# Altium PCB PCB_L2-P2.3.PcbDoc
Units mm, origin at the board's own origin, x right, y up, seen from the top; angles counter-clockwise.
Board outline 155.28 x 23.28 mm, 2 copper layers (Top Layer, Bottom Layer); 45 components, 45 nets, 147 pads, 77 vias.
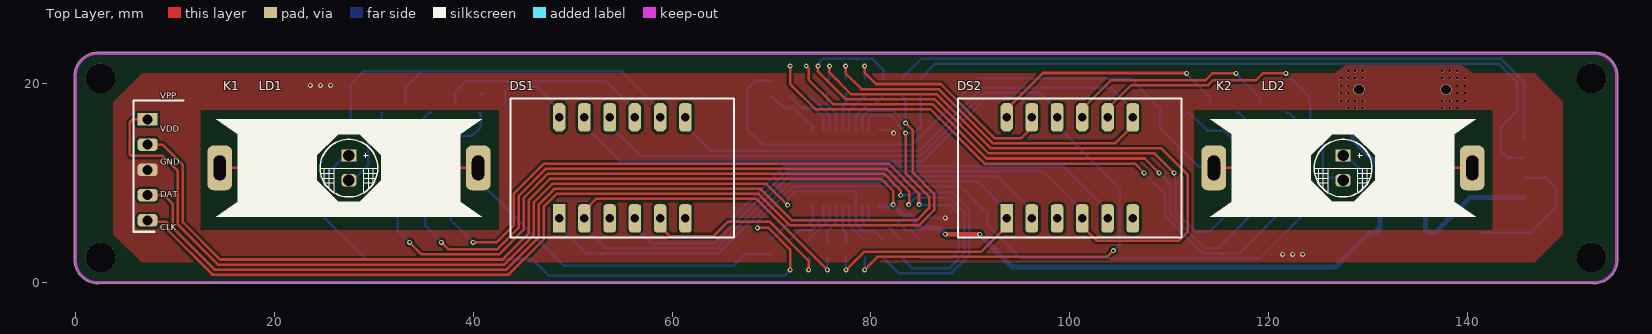
[diagram p0: Top Layer view]
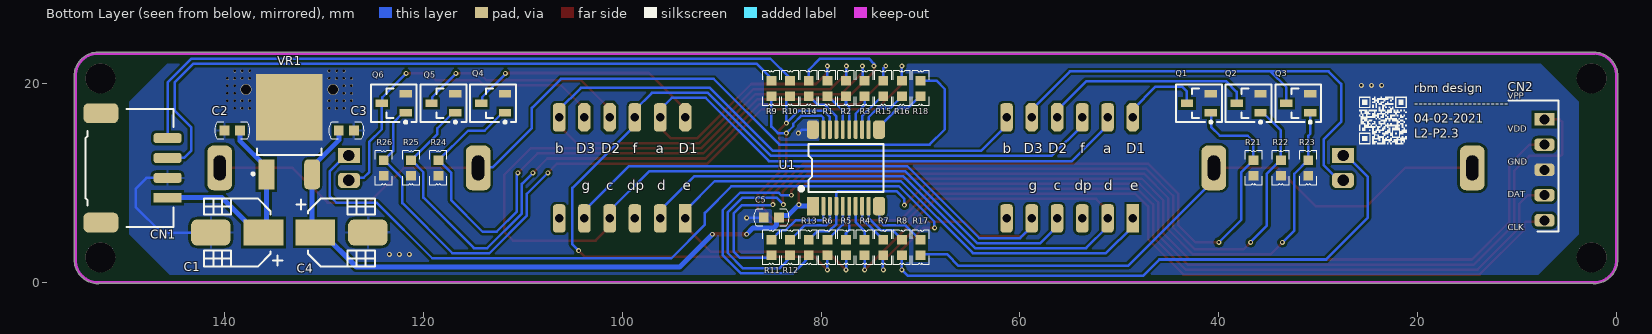
[diagram p1: Bottom Layer view, seen from below]
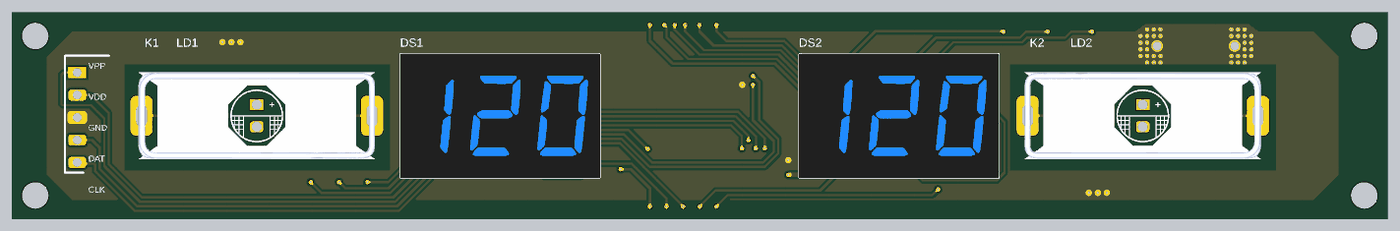
[diagram p2: 3D render of the assembled board from above, using the file's embedded part models]
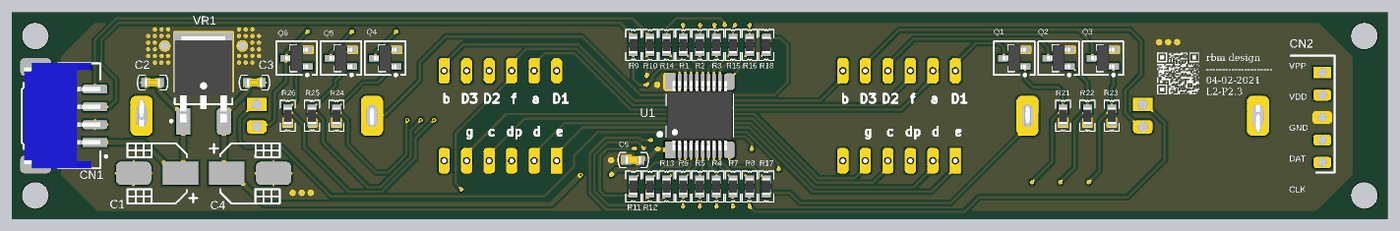
[diagram p3: 3D render of the assembled board from below, using the file's embedded part models]

## Layer stack, top to bottom
Top Solder: solder mask 0.0102, Solder Resist, Dk 3.5
Top Layer: signal copper 0.0356
Dielectric 1: dielectric 0.32, FR-4, Dk 4.8
Bottom Layer: signal copper 0.0356
Bottom Solder: solder mask 0.0102, Solder Resist, Dk 3.5

## Board outline
-0.139,2.25 cw(c-0.011,2.25) -0.127,2.302 -0.127,20.698 cw(c-0.011,20.75) -0.139,20.75 cw(c2.25,20.75) 2.25,23.139 cw(c2.25,23.011) 2.302,23.127 152.698,23.127 cw(c152.75,23.011) 152.75,23.139 cw(c152.75,20.75) 155.139,20.75 cw(c155.011,20.75) 155.127,20.698 155.127,2.302 cw(c155.011,2.25) 155.139,2.25 cw(c152.75,2.25) 152.75,-0.139 cw(c152.75,-0.011) 152.698,-0.127 2.302,-0.127 cw(c2.25,-0.011) 2.25,-0.139 cw(c2.25,2.25)

## Design rules (kind name [scope] priority, off if disabled: settings)
Clearance [All] p1: gap=0.254 ignorepadtopadclearanceinfootprint=FALSE except(0: Arc-Hole Track-Hole SMDPad-Hole THPad-Hole Via-Hole Fill-Hole Poly-Hole Region-Hole Text-Hole)
HoleSize [All] p1: absolutevalues=TRUE maxlimit=4 minlimit=0.025 maxpercent=80.000 minpercent=20.000
PlaneConnect [All] p1: planeconnectstyle=Direct reliefexpansion=0.508 reliefentries=4 reliefconductorwidth=0.254 reliefairgap=0.254
PolygonConnect [All] p1: connectstyle=Direct reliefconductorwidth=0.254 reliefentries=4 polygonreliefangle="90 Angle" airgapwidth=0.254
RoutingVias [All] p1: holewidth=0.25 width=0.5 viastyle="Through Hole" minholewidth=0.2 minwidth=0.25 maxholewidth=1 maxwidth=2
SolderMaskExpansion [All] p1: expansion=0.102 istentingtop=FALSE
Width [All] p1: maxlimit=0.5 minlimit=0.254 preferedwidth=0.254
28 further rules are at their usual default settings.

## Components (designator, comment, footprint, x,y, rotation, side; value= is the part's Value field where it differs from the comment)
C1 "100uF ±20% 25V" C_SMD_Ø6.3*5.4mm 138.75,5 r0 bottom
C2 "470nF ±10% 25V X7R" C_0603 139.25,15.25 r0 bottom
C3 "100nF ±10% 25V X7R" C_0603 127.75,15.25 r180 bottom
C4 "100uF ±20% 16V" C_SMD_Ø6.3*5.4mm 128.25,5 r180 bottom
C5 "470nF ±10% 25V X7R" C_0603 85,6.5 r0 bottom
CN1 "PH Header Male; White" CN_4P_A2001WR-S-XP-LCP 148.5,11.5 r0 bottom
CN2 "Pin Header" CN_PIC_MCU_Debugger_RightAngle 7.239,11.303 r180 bottom
DS1 "Display>> 7Seg 3Dig" "DS_0.36\"_3DIG" 55,11.5 r0 top locked
DS2 "Display>> 7Seg 3Dig" "DS_0.36\"_3DIG" 100,11.5 r0 top locked
K1 "Holo Type" K_CAP-TOUCH-SQUARE_LED 27.5,11.5 r180 top locked
K2 "Holo Type" K_CAP-TOUCH-SQUARE_LED 127.5,11.5 r0 top locked
LD1 "3.2V 20mA >1000mcd" LED_4.8x5.8_P2.54 27.5,11.5 r270 top locked
LD2 "3.2V 40mA >1000mcd" LED_4.8x5.8_P2.54 127.5,11.5 r270 top locked
Q1 "NPN 500mA 45V 300mW" Q_SOT-23_NPN 42,18 r90 bottom locked
Q2 "NPN 500mA 45V 300mW" Q_SOT-23_NPN 37,18 r90 bottom
Q3 "NPN 500mA 45V 300mW" Q_SOT-23_NPN 32,18 r90 bottom
Q4 "NPN 500mA 45V 300mW" Q_SOT-23_NPN 113,18 r90 bottom
Q5 "NPN 500mA 45V 300mW" Q_SOT-23_NPN 118,18 r90 bottom
Q6 "NPN 500mA 45V 300mW" Q_SOT-23_NPN 123,18 r90 bottom
R1 "120Ω ±1% 0.125W ±100ppm/℃" R_0603 79.375,19.5 r90 bottom
R2 "120Ω ±1% 0.125W ±100ppm/℃" R_0603 77.5,19.5 r90 bottom
R3 "120Ω ±1% 0.125W ±100ppm/℃" R_0603 75.625,19.5 r90 bottom
R4 "120Ω ±1% 0.125W ±100ppm/℃" R_0603 75.625,3.5 r270 bottom
R5 "120Ω ±1% 0.125W ±100ppm/℃" R_0603 77.5,3.5 r270 bottom
R6 "120Ω ±1% 0.125W ±100ppm/℃" R_0603 79.375,3.5 r270 bottom
R7 "120Ω ±1% 0.125W ±100ppm/℃" R_0603 73.75,3.5 r270 bottom
R8 "120Ω ±1% 0.125W ±100ppm/℃" R_0603 71.875,3.5 r270 bottom
R9 "120Ω ±1% 0.125W ±100ppm/℃" R_0603 85,19.5 r90 bottom
R10 "120Ω ±1% 0.125W ±100ppm/℃" R_0603 83.125,19.5 r90 bottom
R11 "1kΩ ±1% 0.1W ±50ppm/℃" R_0603 85,3.5 r270 bottom
R12 "1kΩ ±1% 0.1W ±50ppm/℃" R_0603 83.125,3.5 r270 bottom
R13 "1kΩ ±1% 0.1W ±50ppm/℃" R_0603 81.25,3.5 r270 bottom
R14 "1kΩ ±1% 0.1W ±50ppm/℃" R_0603 81.25,19.5 r90 bottom
R15 "1kΩ ±1% 0.1W ±50ppm/℃" R_0603 73.75,19.5 r90 bottom
R16 "1kΩ ±1% 0.1W ±50ppm/℃" R_0603 71.875,19.5 r90 bottom
R17 "1kΩ ±1% 0.1W ±50ppm/℃" R_0603 70,3.5 r270 bottom
R18 "1kΩ ±1% 0.1W ±50ppm/℃" R_0603 70,19.5 r90 bottom
R21 "47kΩ ±1% 0.1W ±100ppm/℃" R_0603 36.5,11.5 r270 bottom
R22 "47kΩ ±1% 0.1W ±100ppm/℃" R_0603 33.75,11.5 r270 bottom
R23 "47kΩ ±1% 0.1W ±100ppm/℃" R_0603 31,11.5 r270 bottom
R24 "47kΩ ±1% 0.1W ±100ppm/℃" R_0603 118.5,11.5 r270 bottom
R25 "47kΩ ±1% 0.1W ±100ppm/℃" R_0603 121.25,11.5 r270 bottom
R26 "47kΩ ±1% 0.1W ±100ppm/℃" R_0603 124,11.5 r270 bottom
U1 "PIC16F18346T-I/SS" U_PIC_20pin_SSOP 77.5,11.5 r90 bottom locked
VR1 "Fixed 5V @ 1A(typ)" VR_TO-252-2(DPAK) 133.5,15 r180 bottom

## Footprints (in the part's own frame and the unit in brackets; to place one, negate y for a bottom-side part, rotate by r counter-clockwise, add the part's x,y. Pads: shape width x height; smd on the part's side, far side on the other; paste and mask are expansions set on the pad)
C_0603 [mm] "0603 Multilayer Ceramic Capacitors MLCC - SMD/SMT RoHS"
  rect 1x1 smd: 1(-0.775,0) 2(0.775,0)
  silkscreen extent -1.72,-0.85 1.72,0.85, body extent -0.85,-0.45 0.85,0.45, height 0.87
C_SMD_Ø6.3*5.4mm [mm] "SMD 6.3x5.4mm Aluminum Electrolytic Capacitors - SMD RoHS"
  rect 4x2.65 smd: 1(-2.65,0)
  rrect50% 4x2.65 smd: 2(2.65,0)
  silkscreen extent -4.54,-3.4 3.35,3.4, body extent -3.4,-3.4 3.4,3.4, height 5.8
CN_4P_A2001WR-S-XP-LCP [mm]
  rrect50% 3.5x2 smd: 0(3.95,-5.5) 0(3.95,5.5)
  rect 2.8x1 smd: 1(-2.75,3)
  rrect50% 2.8x1 smd: 2(-2.75,1) 3(-2.75,-1) 4(-2.75,-3)
  round 0.5 on Bottom Overlay: ""(-4,4.6)
  silkscreen extent -3.35,-5.94 5.51,5.95, body extent -3.35,-5.95 5.25,5.95, height 5.6
CN_PIC_MCU_Debugger_RightAngle [mm] "2.54mmPitch, 5pins, StraightType, Male Connector"
  rect 2x1.25 hole 1: 1(0,5.08)
  rrect50% 2x1.25 hole 1: 2(0,2.54) 3(0,0) 4(0,-2.54) 5(0,-5.08)
  silkscreen extent -3.6,-6.22 1.4,6.98
"DS_0.36\"_3DIG" [mm] "SLR0363DWC1BD"
  rect 1.25x2.85 hole 0.85: 1(-6.35,-5.08)
  rrect50% 1.25x2.85 hole 0.85: 2(-3.81,-5.08) 3(-1.27,-5.08) 4(1.27,-5.08) 5(3.81,-5.08) 6(6.35,-5.08) 7(6.35,5.08) 10(-1.27,5.08) 11(-3.81,5.08)
  oct 1.25x2.85 hole 0.85: 8(3.81,5.08) 9(1.27,5.08) 12(-6.35,5.08)
  silkscreen extent -11.25,-7 11.25,7, body extent -11.3,-7.05 11.3,7.05, height 7.2
K_CAP-TOUCH-SQUARE_LED [mm]
  rrect50% 2.5x4.5 hole 2.5 slot 1.25 at 0 deg: 1(-13,0) 1(13,0)
  silkscreen extent -13.35,-4.9 13.35,4.9, body extent -13.35,-4.85 13.35,4.86, height 11.61
LED_4.8x5.8_P2.54 [mm] "HL-798H256WC-MD"
  rect 1.25x1.5 / inner rect 1.5x2.2 / far side rect 1.5x2.2 hole 1.15: 1(-1.25,0)
  rrect50% 1.25x1.5 / inner rrect50% 1.5x2.2 / far side rrect50% 1.5x2.2 hole 1.15: 2(1.25,0)
  silkscreen extent -2.88,-2.9 2.92,2.9, body extent -2.88,-2.9 2.92,2.9, height 4.8
Q_SOT-23_NPN [mm] "NPN 200mA 40V 250mW SOT-23(SOT-23-3)"
  rect 0.75x1.25 smd: 1(-0.95,-1.2) 2(0.95,-1.2) 3(0,1.2)
  silkscreen extent -2.02,-2.3 1.9,2.3, body extent -1.5,-1.3 1.5,1.3, height 1.15
R_0603 [mm] "RK73G1JTTD1000F; 0603 Chip Resistor - Surface Mount RoHS"
  rect 0.95x1 smd: 1(-0.775,0) 2(0.775,0)
  silkscreen extent -1.75,-0.85 1.75,0.85, body extent -0.9,-0.45 0.9,0.45, height 0.55
U_PIC_20pin_SSOP [mm] "SOP, 20-Leads, Body 7.20x5.30mm, Pitch 0.65mm, IPC Medium Density"
  rect 1.85x1.2 smd mask+0.2: 1(-3.85,3.33)
  rrect50% 1.85x0.395 smd mask+0.2: 2(-3.85,2.275) 3(-3.85,1.625) 4(-3.85,0.975) 5(-3.85,0.325) 6(-3.85,-0.325) 7(-3.85,-0.975) 8(-3.85,-1.625) 9(-3.85,-2.275) 12(3.85,-2.275) 13(3.85,-1.625) 14(3.85,-0.975) 15(3.85,-0.325) 16(3.85,0.325) 17(3.85,0.975) 18(3.85,1.625) 19(3.85,2.275)
  rrect50% 1.85x1.2 smd mask+0.2: 10(-3.85,-3.33) 11(3.85,-3.33) 20(3.85,3.33)
  silkscreen extent -2.4,-3.75 2.4,4.63, body extent -3.9,-3.75 3.9,3.75, height 2
VR_TO-252-2(DPAK) [mm] "D-PAK, 3-Pads, Body 6.20x6.61mm (max), IPC Medium Density"
  rect 6.7x6.7 smd: GND(0,2.6)
  rect 1.6x3 smd: V-IN(-2.3,-4.15)
  rrect50% 1.6x3 smd: V-OUT(2.3,-4.15)
  silkscreen extent -3.78,-4.22 3.25,-1.55, body extent -3.25,-4.27 3.25,5.45, height 2.5

## Part data
C1 C4: library part "Capacitor>> Polar", "SMD,6.3x5.4mm Aluminum Electrolytic Capacitors - SMD RoHS"
C2 C3 C5: library part "Capacitor>> Non-Polar", "0603 Multilayer Ceramic Capacitors MLCC - SMD/SMT RoHS"
CN1: library part "Connector>> 4Pins", "A2001WR-S-4P; Pin 0.079\"(2.00mm) 4 SMD,P=2mm Wire To Board / Wire To Wire Connector RoHS"
CN2: library part "Connector>> PIC Program", "A2541WR-5P/MTB125-1105R1/PZ254R-11-05P ;5pins, right-angle 90degrees 2.54mm Through Hole,P=2.54mm Pin Header & Female Header RoHS"
K1 K2: library part "Key>> Cap Touch"
LD1 LD2: library part "LED>> General Purpose"
Q1 Q2 Q3 Q4 Q5 Q6: library part "Transistor>> BJT npn", "BC817-40; SOT-23(SOT-23-3) Transistors (NPN/PNP) RoHS"
R1 R2 R3 R4 R5 R6 R7 R8 R9 R10: library part "Resistor>> General Purpose", "RK73H1JTTD1200F; 0603 Chip Resistor - Surface Mount RoHS"
R11 R12 R13 R14 R15 R16 R17 R18: library part "Resistor>> General Purpose", "RK73G1JTTD1001F; 0603 Chip Resistor - Surface Mount RoHS"
R21 R22 R23 R24 R25 R26: library part "Resistor>> General Purpose", "RK73H1JTTD4702F; 0603 Chip Resistor - Surface Mount RoHS"
U1: library part "IC>> PIC 20Pins", "Lead Count: 20 / Package Type: SSOP / Temp Range: -40C to +85C / Packing Media: Tape and reel (1600)"
VR1: library part "Voltage Regulator", "CJ78D05/MC7805BDTRKG; TO-252-2(DPAK) Dropout Regulators(LDO) RoHS"

## Free pads (board coordinates)
  round 3 hole 3 unplated: 0(2.5,2.5) 0(2.5,20.5) 0(152.5,2.5) 0(152.5,20.5)

## Via types
v1: diameter 0.5, hole 0.25, Top Layer to Bottom Layer, 39 vias
v2: diameter 0.275, hole 0.25, Top Layer to Bottom Layer, 36 vias
v3: diameter 1.1, hole 1, Top Layer to Bottom Layer, 2 vias

## Nets (pads, with @x,y where several pads share a name; then routed paths per layer and width w, separated by ;. In a path a pad name is that pad's centre, name@x,y a point inside that pad or via, vN(x,y) a via of type N, cw(c..) or ccw(c..) an arc to the next point about the centre after c; other vN are vias at no path point)
+12: C1.1 C2.1 CN1.1 VR1.V-IN | length 22.6
  Bottom Layer w0.5: C2.1 138.475,14.225 135.8,11.55 VR1.V-IN 135.8,5.3 C1.1 136.775,5 140.275,8.5 CN1.1
CLK: CN2.5 R10.1 U1.18 | length 108.3
  Top Layer w0.254: CN2.5 7.366,6.096 9.122,6.096 9.271,5.947 9.271,5.251 13.76,0.762 43.557,0.762 47.117,4.322 47.117,7.624 48.383,8.89 68.703,8.89 71.878,5.715 84.836,5.715 86.36,7.239 86.36,8.89 84.23,11.02 84.23,15.269 v1(83.5,16)
  Bottom Layer w0.254: U1.18 79.125,16.613 79.784,17.272 82.228,17.272 v1@83.498,16.002 ; R10.1 83.15,18.725 83.498,18.377 v1@83.498,16.002 ; v1(83.5,16) v1@83.498,16.002
DAT: CN2.4 R9.1 U1.19 | length 109.8
  Top Layer w0.254: CN2.4 8.89,8.763 9.779,7.874 9.779,5.461 13.97,1.27 43.347,1.27 46.609,4.532 46.609,7.834 48.173,9.398 68.914,9.398 72.089,6.223 84.626,6.223 85.852,7.449 85.852,8.636 83.5,10.988 v1(83.5,15)
  Bottom Layer w0.254: U1.19 79.775,16.545 79.994,16.764 81.986,16.764 82.808,15.942 82.808,15.692 v1(83.5,15) 84.342,15 85,15.658 R9.1@85,18.975
GND: C1.2 C2.2 C3.2 C4.2 C5.2 CN1.2 CN2.3 Q1.2 Q2.2 Q3.2 Q4.2 Q5.2 Q6.2 R21.2 R22.2 R23.2 R24.2 R25.2 R26.2 U1.20 VR1.GND | length 17.7
  Bottom Layer w0.254: Q1.2 Q1.2@41.05,18.95 ; U1.20 81.914,15.35 82.264,15 v1(82.296,15) ; C5.2 85.798,6.477 v1(87.5,6.477) v1@87.503,6.477 ; C1.2 146.384,5 148.971,7.587 148.971,9.398 147.869,10.5 CN1.2
  other v1: 121.412,2.794 122.428,2.794 123.444,2.794 23.622,19.812 24.638,19.812 25.654,19.812
  other v2: 128,17.504 128.75,17.504 129.5,17.504 137.5,17.504 138.25,17.504 139,17.504 127.25,18.254 128,18.254 128.75,18.254 129.5,18.254 137.5,18.254 138.25,18.254 139,18.254 139.75,18.254 127.25,19.004 128,19.004 139,19.004 139.75,19.004 127.25,19.754 128,19.754 139,19.754 139.75,19.754 127.25,20.504 128,20.504 128.75,20.504 129.5,20.504 137.5,20.504 138.25,20.504 139,20.504 139.75,20.504 128,21.254 128.75,21.254 129.5,21.254 137.5,21.254 138.25,21.254 139,21.254
  other v3: 129.125,19.379 137.875,19.379
I_K1: R17.1 U1.10 | length 6.4
  Bottom Layer w0.254: R17.1 70.348,4.623 70.409,4.623 71.501,5.715 73.66,5.715 74.17,6.225 U1.10
I_K2: R18.1 U1.11 | length 5.7
  Bottom Layer w0.254: R18.1 70.348,18.377 70.396,18.377 71.247,17.526 72.263,17.526 74.17,15.619 U1.11
NetDS1_1: DS1.1 DS2.1 R5.2 | length 71.9
  Top Layer w0.254: v1(77.5,1.25) 79.298,3.048 91.078,3.048 93.65,5.62 DS2.1
  Bottom Layer w0.254: DS1.1 48.65,5.62 51.349,2.921 64.73,2.921 71.969,10.16 90.71,10.16 93.65,7.22 DS2.1 ; v1@77.47,1.25 77.47,2.445 R5.2@77.5,2.475
NetDS1_2: DS1.2 DS2.2 R4.2 | length 81.9
  Top Layer w0.254: DS1.2 51.19,7.22 52.352,8.382 68.493,8.382 v1(75.625,1.25)
  Bottom Layer w0.254: DS1.2 51.19,5.579 53.34,3.429 64.52,3.429 71.759,10.668 92.742,10.668 96.19,7.22 DS2.2 ; v1(75.625,1.25) R4.2@75.625,2.475
NetDS1_4: DS1.4 DS2.4 R3.2 | length 112.6
  Top Layer w0.254: v1(75.85,21.75) 75.819,21.719 75.819,21.082 77.978,18.923 86.61,18.923 92.071,13.462 109.22,13.462 111.887,10.795 111.887,5.08 110.998,4.191 102.699,4.191 101.27,5.62 DS2.4
  Bottom Layer w0.254: DS1.4 56.27,5.62 57.953,3.937 64.309,3.937 71.548,11.176 97.282,11.176 101.27,7.188 DS2.4 ; R3.2 75.819,20.469 75.819,21.719 v1(75.85,21.75)
NetDS1_5: DS1.5 DS2.5 R7.2 | length 72.5
  Top Layer w0.254: DS1.5 58.81,5.62 59.816,4.614 64.126,4.614 65.604,6.092 69.814,6.092 73.75,2.156 v1(73.75,1.25)
  Bottom Layer w0.254: DS1.5 58.81,5.62 59.985,4.445 64.099,4.445 71.338,11.684 99.346,11.684 103.81,7.22 DS2.5 ; R7.2@73.75,2.475 73.787,2.438 v1@73.787,1.25
NetDS1_7: DS1.7 DS2.7 R2.2 | length 86.7
  Top Layer w0.254: v1@77.47,21.861 77.47,21.018 79.057,19.431 86.821,19.431 92.282,13.97 104.54,13.97 106.35,15.78 DS2.7
  Bottom Layer w0.254: DS1.7 61.35,15.78 63.922,13.208 84.836,13.208 91.186,19.558 104.172,19.558 106.35,17.38 DS2.7 ; v1@77.47,21.861 77.47,20.555 R2.2@77.5,20.525
  other v1: 77.47,21.75
NetDS1_8: DS1.8 LD1.2 Q3.3 | length 49.4
  Bottom Layer w0.254: LD1.2 27.903,10.25 29.464,11.811 29.464,14.351 27.686,16.129 27.686,19.939 28.952,21.205 34.794,21.205 ; Q3.3 33.2,19.611 34.794,21.205 ; DS1.8 58.81,17.38 54.985,21.205 34.794,21.205
NetDS1_9: DS1.9 Q2.3 | length 21.5
  Bottom Layer w0.254: Q2.3 38.2,19.15 39.243,20.193 53.34,20.193 56.27,17.263 DS1.9
NetDS1_10: DS1.10 DS2.10 R6.2 | length 94.5
  Top Layer w0.254: v1(79.375,1.25) 80.665,2.54 103.763,2.54 v1(104.394,3.171)
  Bottom Layer w0.254: DS1.10 53.73,15.78 56.81,12.7 85.046,12.7 91.396,19.05 97.028,19.05 98.73,17.348 DS2.10 98.73,15.78 105.029,9.481 105.029,3.806 v1(104.394,3.171) ; v1(79.375,1.25) R6.2@79.375,2.475
NetDS1_11: DS1.11 DS2.11 R1.2 | length 74.3
  Top Layer w0.254: v1@79.375,21.861 79.375,21.082 80.518,19.939 87.031,19.939 92.492,14.478 95.123,14.478 95.807,15.162 95.807,16.197 DS2.11
  Bottom Layer w0.254: DS1.11 51.19,15.78 54.778,12.192 85.257,12.192 91.607,18.542 95.028,18.542 96.19,17.38 DS2.11 ; R1.2@79.375,20.525 v1@79.375,21.861
  other v1: 79.375,21.75
NetDS1_12: DS1.12 Q1.3 | length 8.6
  Bottom Layer w0.254: Q1.3 43.2,19.197 43.688,19.685 46.355,19.685 48.65,17.39 DS1.12
NetDS2_8: DS2.8 LD2.2 Q6.3 | length 34.2
  Top Layer w0.254: DS2.8 103.81,17.45 106.172,19.812 113.919,19.812 114.427,20.32 118.745,20.32 119.425,21 v1(121.75,21)
  Bottom Layer w0.254: v1@121.67,21.08 124.143,18.607 124.143,18.057 Q6.3 124.2,15.373 125.476,14.097 125.476,11.049 126.019,10.506 127.244,10.506 LD2.2
NetDS2_9: DS2.9 Q5.3 | length 21.8
  Top Layer w0.254: DS2.9 101.27,17.45 104.14,20.32 113.665,20.32 114.345,21 v1(116.75,21)
  Bottom Layer w0.254: v1@116.75,20.992 119.135,18.607 119.135,18.065 Q5.3
NetDS2_12: DS2.12 Q4.3 | length 24.4
  Top Layer w0.254: DS2.12 93.65,17.38 97.317,21.047 v1@111.696,21.047
  Bottom Layer w0.254: v1(111.76,21) 111.76,20.955 114.108,18.607 114.108,18.092 Q4.3
NetK1_1: K1.1 R17.2 | length 64
  Top Layer w0.254: K1.1@14.5,11.5 21.266,11.5 25.146,7.62 30.226,7.62 34.106,11.5 K1.1@40.5,11.5
  Bottom Layer w0.254: K1.1@40.5,11.5 40.5,10.3 49.149,1.651 66.167,1.651 67.31,2.794 69.931,2.794 R17.2
NetK2_1: K2.1 R18.2 | length 90.9
  Top Layer w0.254: K2.1@114.5,11.5 121.977,11.5 125.476,8.001 129.667,8.001 133.166,11.5 K2.1@140.5,11.5
  Bottom Layer w0.254: R18.2 68.408,20.275 67.564,19.431 67.564,15.367 69.088,13.843 84.201,13.843 90.805,20.447 106.172,20.447 109.093,17.526 109.093,15.494 113.018,11.569 114.431,11.569 K2.1@114.5,11.5
NetLD1_1: LD1.1 LD2.1 R8.2 | length 138.8
  Top Layer w0.254: v1(68.58,5.461) 69.727,5.461 71.882,3.306 71.882,1.257 v1(71.875,1.25)
  Bottom Layer w0.254: LD1.1 27.15,12.75 25.019,10.619 25.019,6.477 29.21,2.286 45.974,2.286 47.625,0.635 71.267,0.635 71.882,1.25 71.882,2.468 R8.2@71.875,2.475 ; v1(68.58,5.461) 68.62,5.501 68.62,6.092 72.18,9.652 89.027,9.652 91.694,6.985 91.694,5.787 95.072,2.409 119.122,2.409 124.714,8.001 128.778,8.001 129.413,8.636 129.413,11.187 127.85,12.75 LD2.1
NetQ1_1: Q1.1 R11.2 R21.1 | length 82.7
  Top Layer w0.254: v1(40,4) 42.354,4 44.069,5.715 44.069,8.89 47.117,11.938 81.801,11.938 84.844,8.895 v1@84.844,7.75
  Bottom Layer w0.254: R21.1 R21.1@36.525,12.275 ; v1(40,4) 37.719,6.281 37.719,11.081 R21.1@36.525,12.275 ; Q1.1@40.55,17.05 Q1.1 40.767,17.017 40.767,15.621 39.878,14.732 37.084,14.732 36.525,14.173 R21.1@36.525,12.275 ; v1@84.844,7.751 87.967,7.751 88.773,6.945 88.773,3.048 88.2,2.475 R11.2@85,2.475
  other v1: 84.85,7.809
NetQ2_1: Q2.1 R12.2 R22.1 | length 88.1
  Top Layer w0.254: v1(36.8,4) 37.498,3.302 42.374,3.302 44.577,5.505 44.577,8.68 47.327,11.43 81.534,11.43 83.848,9.116 83.848,7.848 v1(83.809,7.809)
  Bottom Layer w0.254: Q2.1 35.55,17.05 33.75,15.25 R22.1 33.775,12.275 35.179,10.871 35.179,5.671 36.8,4.05 v1(36.8,4) ; R12.2@83.15,2.475 83.498,2.127 83.498,2.102 84.053,1.547 ; v1(83.809,7.809) 84.509,8.509 87.928,8.509 89.408,7.029 89.408,2.965 87.84,1.397 84.202,1.397 84.053,1.546
NetQ3_1: Q3.1 R13.2 R23.1 | length 92.9
  Top Layer w0.254: v1@33.655,3.937 34.798,2.794 42.585,2.794 45.085,5.294 45.085,8.469 47.538,10.922 81.324,10.922 83,9.246 v1(83,8.75)
  Bottom Layer w0.254: Q3.1 30.8,14.92 31,14.72 R23.1 31.025,12.275 32.385,10.915 32.385,5.215 v1(33.6,4) ; v1@33.655,3.937 v1@33.655,4 ; R13.2@81.275,2.475 81.623,2.127 81.623,2.102 82.836,0.889 88.051,0.889 89.916,2.754 89.916,7.239 88.138,9.017 84.299,9.017 84.032,8.75 v1(83,8.75)
NetQ4_1: Q4.1 R14.2 R24.1 | length 74.6
  Top Layer w0.254: v1@74.676,21.75 74.676,21.209 77.47,18.415 86.4,18.415 91.861,12.954 108.546,12.954 v1(110.5,11)
  Bottom Layer w0.254: v1@74.676,21.971 75.197,22.492 80.124,22.492 81.25,21.366 R14.2@81.25,20.525 ; v1(110.5,11) 110.617,10.883 110.617,7.112 112.649,5.08 114.046,5.08 117.221,8.255 117.221,11.021 R24.1@118.475,12.275 ; Q4.1 112.05,17.05 113.86,15.24 115.51,15.24 R24.1@118.475,12.275 ; R24.1 R24.1@118.475,12.275
  other v1: 74.688,21.75
NetQ5_1: Q5.1 R15.2 R25.1 | length 71
  Top Layer w0.254: v1(73.5,21.75) 73.75,21.5 73.75,20.357 76.2,17.907 86.189,17.907 91.65,12.446 107.554,12.446 v1(109,11)
  Bottom Layer w0.254: v1(73.5,21.75) 73.75,21.5 R15.2@73.75,20.525 ; v1(109,11) 110.109,9.891 110.109,6.902 113.586,3.425 114.931,3.425 120.015,8.509 120.015,11.065 R25.1@121.225,12.275 ; Q5.1 117.05,17.05 118.612,15.488 118.612,14.913 120.877,12.648 120.877,12.623 R25.1@121.225,12.275 ; R25.1 R25.1@121.225,12.275
NetQ6_1: Q6.1 R16.2 R26.1 | length 74.6
  Top Layer w0.254: v1(71.875,21.75) 71.875,19.946 74.422,17.399 85.979,17.399 91.44,11.938 106.562,11.938 v1(107.5,11)
  Bottom Layer w0.254: R16.2@71.875,20.525 v1(71.875,21.75) ; v1(107.5,11) 109.601,8.899 109.601,6.691 113.375,2.917 117.09,2.917 122.131,7.958 122.131,10.431 R26.1@123.975,12.275 ; Q6.1 122.05,17.05 123.063,16.037 123.063,13.187 R26.1@123.975,12.275 ; R26.1 R26.1@123.975,12.275
O_7S1: R1.1 U1.16 | length 4.1
  Bottom Layer w0.254: U1.16 77.825,17.246 78.956,18.377 79.027,18.377 R1.1
O_7S2: R2.1 U1.15 | length 3.8
  Bottom Layer w0.254: U1.15 77.175,17.612 77.5,17.937 R2.1@77.5,18.975
O_7S3: R3.1 U1.14 | length 4
  Bottom Layer w0.254: R3.1@75.625,18.975 75.625,17.847 76.525,16.947 U1.14
O_7S4: R4.1 U1.7 | length 4
  Bottom Layer w0.254: R4.1@75.625,4.025 75.625,5.14 76.525,6.04 U1.7
O_7S5: R5.1 U1.6 | length 3.8
  Bottom Layer w0.254: U1.6 77.175,5.254 77.5,4.929 R5.1@77.5,4.025
O_7S6: R6.1 U1.5 | length 4
  Bottom Layer w0.254: U1.5 77.825,5.804 79.002,4.627 79.002,4.623 79.35,4.275 R6.1
O_7S7: R7.1 U1.8 | length 4.3
  Bottom Layer w0.254: R7.1 73.775,4.275 74.123,4.623 74.123,4.654 75.875,6.406 U1.8
O_7S8: R8.1 U1.9 | length 5.5
  Bottom Layer w0.254: R8.1 71.9,4.275 72.248,4.623 72.248,4.684 72.771,5.207 73.958,5.207 75.225,6.474 U1.9
O_DIG11: R11.1 U1.2 | length 7.4
  Bottom Layer w0.254: U1.2 79.775,6.372 79.924,6.223 82.571,6.223 83.561,5.233 84.017,5.233 84.975,4.275 R11.1
O_DIG12: R12.1 U1.3 | length 6.3
  Bottom Layer w0.254: U1.3 79.125,6.092 79.502,5.715 81.661,5.715 R12.1@82.752,4.624 ; R12.1@82.752,4.623 83.1,4.275 R12.1
O_DIG13: CN2.1 R13.1 U1.4 | length 99.7
  Top Layer w0.254: CN2.1 5.715,16.383 5.461,16.129 5.461,12.849 5.61,12.7 8.763,12.7 10.287,11.176 10.287,5.82 12.318,3.789 12.805,3.302 13.821,2.286 14.329,1.778 43.136,1.778 43.644,2.286 46.101,4.743 46.101,8.045 47.962,9.906 69.469,9.906 v1(71.628,7.747)
  Bottom Layer w0.254: v1(71.628,7.747) 71.628,8.382 72.39,9.144 78.326,9.144 78.475,8.995 U1.4 78.475,5.872 79.216,5.131 80.369,5.131 R13.1@81.25,4.25
O_DIG21: R14.1 U1.17 | length 5
  Bottom Layer w0.254: U1.17 78.475,16.682 79.662,17.869 80.369,17.869 R14.1@81.25,18.75
O_DIG22: R15.1 U1.13 | length 4.3
  Bottom Layer w0.254: R15.1 74.098,18.377 74.206,18.377 75.875,16.708 U1.13
O_DIG23: R16.1 U1.12 | length 5.5
  Bottom Layer w0.254: R16.1 71.9,18.725 72.248,18.377 72.248,18.303 73.025,17.526 74.295,17.526 75.225,16.596 U1.12
RX: CN1.3 R9.2 | length 71.6
  Bottom Layer w0.254: R9.2@85.025,20.525 86.484,21.984 143.119,21.984 145.03,20.073 145.03,17.258 143.383,15.611 143.383,13.208 144.091,12.5 CN1.3
TX: CN1.4 R10.2 | length 70
  Bottom Layer w0.254: R10.2@83.15,20.525 85.117,22.492 143.33,22.492 145.75,20.072 CN1.4
VDD: C3.1 C4.1 C5.1 CN2.2 U1.1 VR1.V-OUT | length 155.7
  Top Layer w0.254: CN2.2 8.763,13.843 10.795,11.811 10.795,6.031 14.54,2.286 42.926,2.286 45.593,4.953 45.593,8.255 47.752,10.414 81.026,10.414 82.25,9.19 v1(82.25,7.809)
  Top Layer w0.5: v1@87.63,4.826 v1(90.932,4.826)
  Bottom Layer w0.5: U1.1 v1@82.25,7.65 ; v1(82.25,7.809) 82.25,7.793 83.312,6.731 83.354,6.689 C5.1@84.036,6.689 ; C5.1 84.475,6.25 84.475,5.754 84.768,5.461 86.865,5.461 v1(87.5,4.826) ; v1(90.932,4.826) 94.234,1.524 126.749,1.524 130.225,5 C4.1 ; C3.1 128.525,14.288 131.2,11.613 VR1.V-OUT 131.2,5.3 C4.1@130.9,5.3
pads on no net: CN1. CN1.0 DS1.3 DS1.6 DS2.3 DS2.6

## Polygon pours and split planes (outlines as drawn)
GND on Top Layer "GND_L01_P000" (solid, pour order 0): 6.696,21 126.619,21 127.762,21.844 139.438,21.844 140.581,21 146.767,21 149.606,18.161 149.606,4.826 146.78,2 6.636,2 3.81,4.826 3.81,18.114
GND on Bottom Layer "GND_L02_P001" (solid, remove dead copper, pour order 1): 3.81,18.161 7.62,21.971 145.796,21.971 149.606,18.161 149.606,4.826 145.536,0.762 7.874,0.762 3.81,4.826

## Keep-outs
Keep-Out Layer:
  lines w0.254: -0.011,2.25 ccw(c2.25,2.25) 2.25,-0.011 ; -0.011,20.75 cw(c2.25,20.75) 2.25,23.011 ; 0,2.159 0,20.828 ; 2.159,0 152.781,0 ; 2.172,23 152.895,23 ; 152.75,-0.011 ccw(c152.75,2.25) 155.011,2.25 ; 152.75,23.011 cw(c152.75,20.75) 155.011,20.75 ; 155,2.219 155,20.895

## Other copper
Top Layer:
  pour cut-out: 112.522,17.303 142.522,17.303 142.522,5.303 112.522,5.303
  pour cut-out: 12.573,17.303 42.573,17.303 42.573,5.303 12.573,5.303

## Silkscreen, mask and mechanical layers (free items; w line width, h text height)
Bottom Overlay:
  drawing of 44 lines, arcs and shapes, not listed
  text "rbm design / --------------------- / 04-02-2021 / L2-P2.3" at 20.32,14.224 h1.52

## Text inside footprints (layer, text, board x,y; h text height)
CN2: Top Overlay "VPP /  /  / VDD /  /  / GND /  /  / DAT /  /  / CLK" at 8.539,4.983 h1.1; Bottom Overlay "VPP /  /  / VDD /  /  / GND /  /  / DAT /  /  / CLK" at 10.939,4.983 h1.1
DS1: Bottom Overlay "D1" at 49.33,12.95 h1; Bottom Overlay "D2" at 57.13,12.95 h1; Bottom Overlay "D3" at 59.64,12.95 h1; Bottom Overlay "d" at 51.5,9.25 h1; Bottom Overlay "dp" at 54.5,9.25 h1; Bottom Overlay "e" at 48.9,9.25 h1; Bottom Overlay "c" at 56.6,9.25 h1; Bottom Overlay "g" at 59.1,9.25 h1; Bottom Overlay "f" at 53.93,12.95 h1; Bottom Overlay "b" at 61.73,12.95 h1; Bottom Overlay "a" at 51.63,12.95 h1
DS2: Bottom Overlay "D1" at 94.33,12.95 h1; Bottom Overlay "D2" at 102.13,12.95 h1; Bottom Overlay "D3" at 104.64,12.95 h1; Bottom Overlay "d" at 96.5,9.25 h1; Bottom Overlay "dp" at 99.5,9.25 h1; Bottom Overlay "e" at 93.9,9.25 h1; Bottom Overlay "c" at 101.6,9.25 h1; Bottom Overlay "g" at 104.1,9.25 h1; Bottom Overlay "f" at 98.93,12.95 h1; Bottom Overlay "b" at 106.73,12.95 h1; Bottom Overlay "a" at 96.63,12.95 h1